# Altium PCB poyu.pcbdoc (part 2 of 2)
Units mm, origin at the board's own origin, x right, y up, seen from the top; angles counter-clockwise.
Board outline 44.28 x 42.46 mm, 4 copper layers (Top Layer, GND, VCC, Bottom Layer), stack 1.564 mm thick; 93 components, 51 nets, 337 pads, 150 vias.
Unrouted connection lines stored in the file: 71.
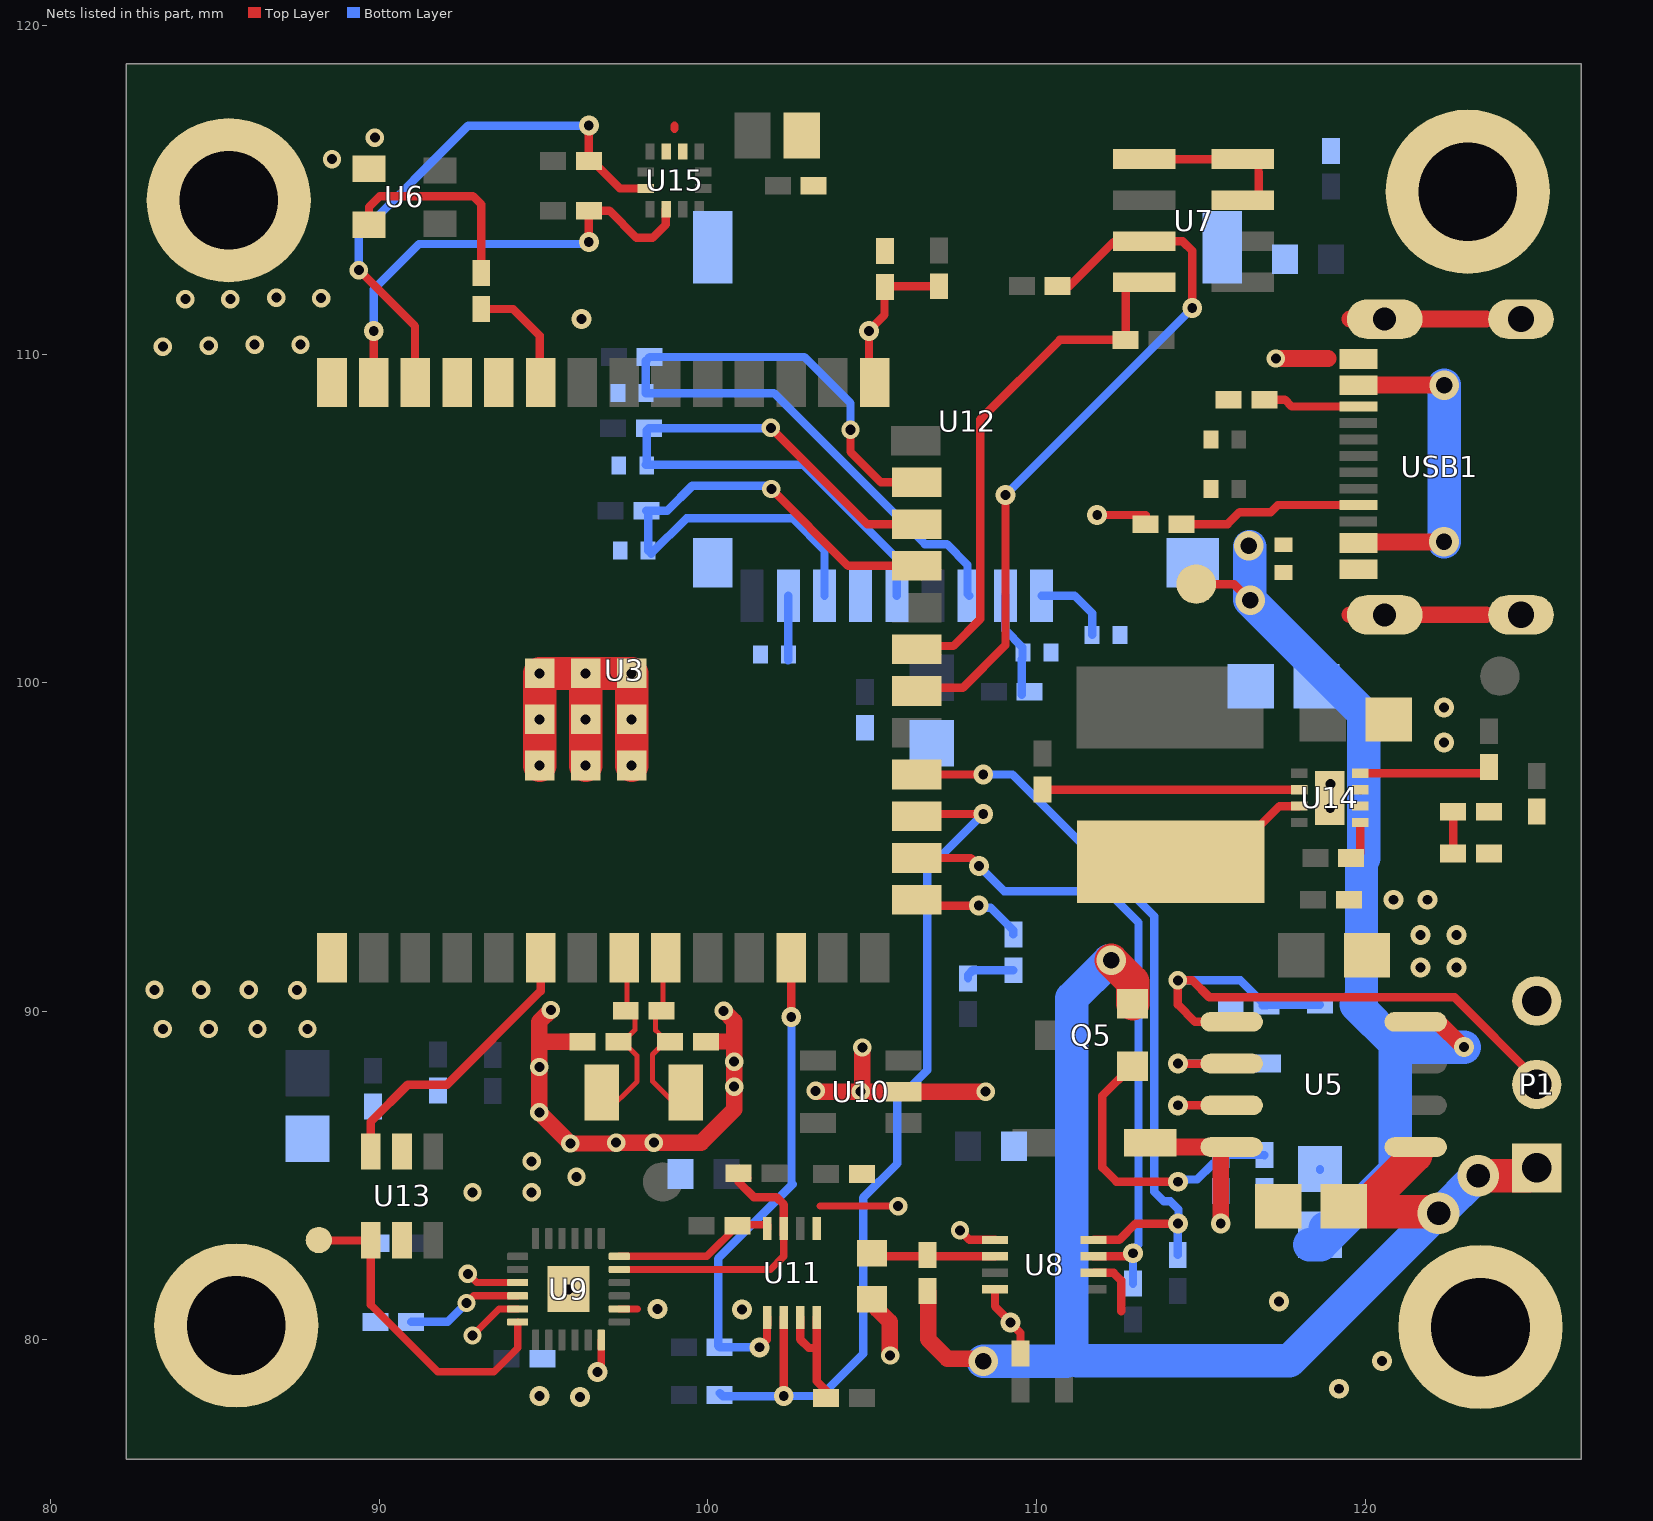
[diagram p4: the nets of this part, all layers, seen from the top]

## Via types
v1: diameter 0.559, hole 0.305, Top Layer to Bottom Layer, tented both sides, 79 vias
v2: diameter 0.605, hole 0.3, Top Layer to Bottom Layer, tented both sides, 57 vias
v3: diameter 0.9, hole 0.5, Top Layer to Bottom Layer, tented both sides, 6 vias
v4: diameter 0.605, hole 0.305, Top Layer to Bottom Layer, tented both sides, 5 vias
v5: diameter 1.27, hole 0.711, Top Layer to Bottom Layer, tented both sides, 3 vias

## Nets (pads, with @x,y where several pads share a name; then routed paths per layer and width w, separated by ;. In a path a pad name is that pad's centre, name@x,y a point inside that pad or via, vN(x,y) a via of type N, cw(c..) or ccw(c..) an arc to the next point about the centre after c; other vN are vias at no path point) (continued)
GND: C1.1 C2.1 C5.2 C6.2 C7.2 C12.1 C13.1 C14.1 C15.1 C16.1 C17.1 C18.1 C20.1 C21.1 C22.1 C23.1 C24.1 C26.2 C27.2 C28.2 C31.1 C32.1 C33.2 C41.1 C42.1 C44.2 D6.1 D7.1 D8.1 D9.1 D10.1 D11.1 D12.1 D13.1 D16.2 P1.3 pad.0 pad.1 pad.2 pad.3 R1.2 R3.1 R24.2 R27.2 R28.1 R55.2 U3.1 U3.40 U3.41 U5.3 U6.4 U7.3 U7.4 U7.5 U8.1 U8.4 U8.6 U9.9 U9.11 U9.18 U9.20 U9.25 U10.2 U11.1 U12.6 U12.10 U12.11 U12.12 U12.13 U13.2 U13.5 U14.2 U14.3 U14.9 U15.8 U15.9 USB1.0 USB1.A1B12 USB1.B1A12 | length 65.6
  Top Layer w0.219: v4@96.757,79.27 U9.18@96.757,80 ; U9.20@97.303,80.946 97.852,80.946 ; 103.418,84.074 v1(105.791,84.074)
  Top Layer w0.22: v1(92.697,82.014) 92.964,81.746 U9.9@94.213,81.746 ; v1(92.837,80.137) 93.646,80.946 U9.11@94.213,80.946
  Top Layer w0.254: 98.986,116.857 98.986,116.952 ; v1(107.671,83.337) 107.962,83.046 U8.1@108.736,83.046 ; U8.4@108.736,81.546 108.736,81.022 109.211,80.547 v2(109.211,80.53) 109.211,80.517 109.514,80.214 C18.1@109.514,79.59 ; U8.6@111.736,82.046 111.738,82.044 112.346,82.044 112.573,81.817 112.573,80.871 ; v2(111.846,105.105) 113.319,105.105 ; U7.5@113.757,115.934 U7.4@116.755,115.934 ; v2(114.3,87.141) U5.3@115.937,87.141 ; 116.755,115.533 U7.4@116.755,115.934 ; U7.3@116.757,114.684 116.757,115.533 ; U7.4@116.757,115.934 U7.4@116.755,115.934 ; U14.9@118.923,96.495 U14.9@118.939,96.478 ; v2(118.94,96.921) 118.939,96.92 U14.9@118.939,96.478 ; U14.9@118.995,96.245 v2(118.939,96.189) U14.9@118.939,96.478 ; U14.3@119.85,96.745 U14.3@119.863,96.732
  Top Layer w0.5: U3.1@88.392,91.463 U3.1@88.561,91.632 ; v1(95.222,90.041) 94.869,89.687 94.869,89.103 ; C21.1@96.186,89.078 94.894,89.078 94.869,89.103 ; C20.1@99.935,89.078 99.939,89.082 100.801,89.082 ; v1(100.481,90.016) 100.801,89.695 100.801,89.082 ; v1@103.276,87.556 v1(104.648,87.556) U10.2@105.948,87.556 v1(108.451,87.556) ; v1@104.699,87.623 v1(104.699,88.9) ; C17.1@105.156,81.166 105.156,80.937 105.537,80.556 105.537,79.54 v1(105.548,79.529) ; 94.869,89.103 v1(94.869,88.306) v1(94.869,86.925) v1(95.815,85.979) 97.164,85.979 97.19,86.004 99.792,86.004 100.801,87.014 v1(100.801,87.706) v1(100.801,88.468) 100.801,89.082
  Top Layer w0.508: v1(117.283,109.865) 118.878,109.865 ; USB1.0@119.533,102.069 123.683,102.069 ; USB1.0@119.533,111.069 123.683,111.069
  Top Layer w1.016: v1(94.881,97.482) v1(94.881,98.882) v1(94.881,100.282) v1(96.282,100.282) ; v1(96.282,97.482) v1(96.282,98.882) v1(96.282,100.282) ; v1(97.682,97.482) v1(97.682,98.882) v1(97.682,100.282) v1(96.282,100.282)
  Bottom Layer w0.254: C15.1@118.624,85.171 C15.1@118.624,85.201
  other v1: 95.758,81.537 92.837,84.491 94.636,84.491 96.001,84.963 94.636,85.435 97.206,86.004 98.355,86.004 103.276,87.579 83.415,89.462 84.811,89.462 86.294,89.462 87.817,89.462 83.16,90.653 84.582,90.653 86.03,90.653 87.503,90.647 83.415,110.227 84.811,110.257 86.208,110.287 87.605,110.287 84.099,111.671 85.471,111.671 86.868,111.718 88.234,111.703 88.561,115.934 89.865,116.586
  other v2: 119.209,78.517 120.507,79.363 101.036,80.923 117.382,81.175 121.689,91.332 122.779,91.332 121.689,92.322 122.779,92.318 120.866,93.397 121.899,93.397 122.398,98.179 122.398,99.251 96.153,111.069
  other v4: 96.107,78.265 94.881,78.294 96.635,79.028 98.47,80.943
GPIO0: C13.2 R20.2 U3.27 | length 4.7
  Top Layer w0.254: U3.27@104.846,109.232 104.902,109.288 v2(104.902,110.7) 104.902,110.721 105.375,111.194 105.375,112.029 105.408,112.063 R20.2@107.043,112.063
GPIO42: R4.1 U3.35 | length 3.6
  Top Layer w0.254: R4.1@93.105,111.374 94.075,111.374 94.882,110.568 94.882,109.162 U3.35@94.911,109.132
IMU_INT1: U3.6 U13.3 | length 8.7
  Top Layer w0.254: U13.3@89.745,85.737 89.745,86.646 90.866,87.767 92.064,87.767 94.911,90.615 U3.6@94.911,91.632
INT1: INT1.TP U9.12 U13.4 | length 9.9
  Top Layer w0.22: 89.745,81.075 91.783,79.037 93.494,79.037 94.213,79.756 U9.12@94.213,80.546
  Top Layer w0.254: INT1.TP@88.161,83.029 89.737,83.029 U13.4@89.745,83.037 89.745,81.075
NETC14_2: C14.2 P1.1 Q5.2 R31.1 U5.5 | length 42.1
  Top Layer w0.254: C14.2@119.353,84.074 C14.2@119.411,84.016 ; P1.1@124.978,84.994 P1.1@125.22,85.236
  Top Layer w0.5: R31.1@106.68,81.497 106.7,81.477 106.7,80.021 107.289,79.433 108.298,79.433 v3(108.374,79.356)
  Top Layer w1.016: v3(112.268,91.554) 112.922,90.9 Q5.2@112.922,90.229 ; C14.2@119.411,84.016 119.985,84.016 120.094,83.907 122.185,83.907 v5(122.234,83.858) ; C14.2@119.985,84.074 U5.5@121.537,85.626 ; v5(123.438,84.994) P1.1@124.978,84.994
  Bottom Layer w0.254: v3(108.374,79.356) v3@108.382,79.364 ; v5(122.234,83.858) v5@122.268,83.858 ; v5@123.404,84.994 v5(123.438,84.994)
  Bottom Layer w1.016: v3(108.374,79.356) 110.898,79.356 111.074,79.532 ; v3@112.217,91.542 111.074,90.399 111.074,79.532 ; v5(122.234,83.858) 122.183,83.858 117.689,79.364 111.242,79.364 111.074,79.532 ; v5@122.268,83.858 v5@123.404,84.994
NETC17_2: C17.2 R31.2 U8.2 | length 3.5
  Top Layer w0.254: C17.2@105.197,82.546 U8.2@108.736,82.546
NetC23_2: C23.2 U9.10 | length 3.6
  Top Layer w0.22: v1(92.655,81.125) 92.875,81.346 U9.10@94.213,81.346
  Bottom Layer w0.254: C23.2@90.969,80.546 90.98,80.557 92.086,80.557 v1(92.655,81.125)
NetC43_2: C43.2 R51.2 R52.2 U14.4 | length 4
  Top Layer w0.254: U14.4@119.85,97.245 123.625,97.245 123.768,97.388 R51.2@123.768,97.434
NetD6_2: D6.2 U12.8 | length 2
  Bottom Layer w0.254: D6.2@102.438,100.679 102.449,100.69 U12.8@102.449,102.65
NetD7_2: D7.2 U12.1 | length 2.4
  Bottom Layer w0.254: U12.1@110.149,102.65 111.158,102.65 111.691,102.117 D7.2@111.691,101.455
NetD8_2: D8.2 R46.2 U12.2 | length 3.2
  Bottom Layer w0.254: U12.2@109.049,102.65 109.049,101.604 109.574,101.079 109.574,100.736 109.555,100.717 R46.2@109.555,99.636
NetL1_1: L1.1 U14.7 | length 4.6
  Top Layer w0.254: L1.1@114.084,94.551 115.701,94.551 117.395,96.245 U14.7@117.995,96.245
NETP1_2: P1.2 R25.1 R28.2 U5.1 | length 20.3
  Top Layer w0.254: v1@114.358,90.887 v1(114.3,90.945) ; U5.1@115.287,89.681 U5.1@115.937,89.681 114.821,89.681 114.3,90.202 v1(114.3,90.945) ; P1.2@125.22,87.776 125.22,87.933 122.722,90.43 115.255,90.43 114.74,90.945 v1(114.3,90.945)
  Bottom Layer w0.254: v1(114.3,90.945) 116.205,90.945 116.877,90.274 116.877,90.18 R28.2@117,90.18 ; R28.2@117.013,90.192 118.611,90.192 R25.1@118.624,90.205
NETQ5_1: Q5.1 R21.2 R24.1 | length 9
  Top Layer w0.254: Q5.1@112.922,88.329 112.897,88.329 112.003,87.435 112.003,85.244 112.431,84.817 v2(114.3,84.817)
  Bottom Layer w0.254: v2(114.3,84.817) 114.367,84.884 114.886,84.884 115.365,85.363 115.46,85.363 115.603,85.506 R21.2@115.603,85.631 116.93,85.631 R24.1@116.937,85.624
NETR1_1: R1.1 USB1.A5 | length 6
  Top Layer w0.254: R1.1@114.409,104.825 115.815,104.825 116.182,105.192 117.129,105.192 117.344,105.407 USB1.A5@120.129,105.407
NETR3_2: R3.2 USB1.B5 | length 2.9
  Top Layer w0.254: R3.2@116.931,108.614 117.555,108.614 117.761,108.407 USB1.B5@119.793,108.407
NETR10_1: R10.1 R11.1 | length 1.5
  Bottom Layer w0.254: R10.1@107.916,91.005 107.916,91.108 108.059,91.251 R11.1@109.296,91.251
NETR11_2: R11.2 U3.15 | length 5.6
  Top Layer w0.2: U3.15@106.351,93.397 106.631,93.118 U3.15@106.468,93.281
  Top Layer w0.254: U3.15@106.406,93.218 v2(108.241,93.218) U3.15@106.631,93.218
  Bottom Layer w0.254: v2(108.241,93.218) 108.308,93.151 108.611,93.151 109.296,92.466 R11.2@109.296,92.341
NETR27_1: R27.1 U5.2 | length 3.3
  Top Layer w0.254: v2(114.3,88.411) U5.2@115.937,88.411
  Bottom Layer w0.254: v2(114.3,88.411) R27.1@115.96,88.411
NetR36_1: R36.1 U11.7 U11.8 | length 3.7
  Top Layer w0.254: U11.7@102.81,80.692 102.81,80.019 103.073,79.756 103.276,79.756 ; U11.8@103.31,80.692 103.31,78.75 R36.1@103.64,78.421
NetR52_1: R52.1 R55.1 | length 1.3
  Top Layer w0.254: R55.1@122.678,94.805 R52.1@122.678,96.075
NetR54_1: R54.1 U14.1 | length 1.3
  Top Layer w0.254: R54.1@119.573,94.667 119.698,94.667 119.85,94.82 U14.1@119.85,95.745
NetR56_2: R56.2 U14.6 | length 7.8
  Top Layer w0.254: R56.2@110.18,96.753 110.189,96.745 U14.6@117.995,96.745
RGB_CTL: R4.2 U6.3 | length 6.3
  Top Layer w0.254: U6.3@89.687,113.938 89.687,114.478 90.018,114.808 92.847,114.808 93.105,114.551 R4.2@93.105,112.419
SCL: R35.2 U3.17 U11.6 | length 27.3
  Top Layer w0.254: v2@102.31,78.294 U11.6@102.31,80.692 ; U3.17@106.351,95.937 106.422,96.008 v2(108.377,96.008)
  Bottom Layer w0.254: R35.2@100.36,78.386 100.458,78.288 102.303,78.288 v2(102.309,78.294) 103.44,78.294 104.724,79.578 104.724,84.328 105.766,85.369 105.766,87.298 106.674,88.206 106.674,94.304 v2(108.377,96.008)
SCL1: R6.1 U3.21 U7.8 | length 16.3
  Top Layer w0.254: U3.21@106.126,101.117 107.467,101.117 108.287,101.937 108.287,108.008 110.712,110.432 R6.1@112.714,110.432 112.714,112.011 112.887,112.184 U7.8@113.278,112.184 ; U7.8@113.724,112.152 U7.8@113.757,112.184
SCL2: R29.1 U3.16 U8.7 | length 19.7
  Top Layer w0.25: U8.7@111.736,82.546 U8.7@111.736,82.546
  Top Layer w0.254: U3.16@106.351,94.667 108.002,94.667 v2(108.246,94.423) v2@108.151,94.423 ; U8.7@111.736,82.546 111.74,82.546 v2@112.747,82.546
  Bottom Layer w0.254: v2(108.246,94.423) 109.011,93.658 112.149,93.658 113.103,92.704 113.103,82.902 112.937,82.736 v2(112.937,82.641) R29.1@112.937,81.713
SCL3: R5.2 U3.38 U15.12 | length 16.7
  Top Layer w0.254: v1(89.381,112.556) 91.088,110.849 91.088,109.146 U3.38@91.101,109.132 ; v2(96.377,116.952) 96.377,115.983 97.321,115.039 U15.12@98.111,115.039
  Bottom Layer w0.254: v1(89.381,112.556) 89.381,113.626 92.707,116.952 v2(96.377,116.952)
SCL_REF: R38.2 U9.23 U11.3 | length 8.8
  Top Layer w0.219: U9.23@97.303,82.146 101.907,82.146 102.31,82.549 U11.3@102.31,83.192
  Top Layer w0.254: R38.2@100.936,84.804 101.397,84.344 102.085,84.344 102.31,84.118 U11.3@102.31,83.392 U11.3@102.31,83.192 ; R38.2@100.936,85.074 100.981,85.074 101.061,85.074 R38.2@101.204,84.931 ; R38.2@101.064,85.004 R38.2@101.064,85.051
SDA: R34.2 U3.12 U11.5 | length 15.1
  Top Layer w0.254: v2(101.566,79.777) 101.799,80.01 U11.5@101.799,80.461 ; U11.5@101.81,80.472 U11.5@101.81,80.692 ; U3.12@102.531,91.632 102.535,91.628 v2(102.535,89.832)
  Bottom Layer w0.254: v2(101.566,79.777) R34.2@100.36,79.777 100.314,79.823 100.314,82.473 102.582,84.741 ; v2@102.489,89.785 v2(102.535,89.832) 102.546,89.821 102.546,84.741
SDA1: R7.1 U3.20 U7.7 | length 22.8
  Top Layer w0.254: U3.20@106.126,99.847 107.758,99.847 109.055,101.144 v2(109.055,105.714) ; R7.1@110.642,112.069 111,112.069 112.344,113.412 U7.7@112.858,113.412 ; U7.7@112.628,113.434 U7.7@113.278,113.434 114.447,113.434 114.74,113.141 v2(114.74,111.399)
  Bottom Layer w0.254: v2(109.055,105.714) v2(114.74,111.399)
SDA2: R26.1 U3.18 U8.8 | length 22.7
  Top Layer w0.254: U3.18@106.502,97.057 U3.18@106.351,97.207 v2(108.377,97.207) ; U8.8@111.736,83.046 112.517,83.046 113.012,83.541 v2(114.3,83.541)
  Bottom Layer w0.254: v2(108.377,97.207) 109.268,97.207 113.584,92.892 113.584,84.509 113.873,84.22 114.075,84.22 114.32,83.974 114.32,83.561 v2(114.3,83.541) R26.1@114.3,82.587
SDA3: R2.2 U3.39 U15.2 | length 14.3
  Top Layer w0.254: U3.39@89.831,109.132 v2(89.831,110.7) ; v2(96.377,113.412) R2.2@96.377,114.363 97,114.363 97.826,113.538 98.316,113.538 98.723,113.945 98.723,114.401 U15.2@98.736,114.414
  Bottom Layer w0.254: v2(89.831,110.7) 89.831,111.97 91.211,113.35 96.314,113.35 v2(96.377,113.412)
SDA_REF: R37.2 U9.24 U11.4 | length 5.1
  Top Layer w0.219: U9.24@97.303,82.546 99.968,82.546 R37.2@100.9,83.478
  Top Layer w0.22: R37.2@100.855,83.51 U11.4@101.807,83.51
  Top Layer w0.254: U11.4@101.807,83.51 101.81,83.507 U11.4@101.81,83.392
TF_CMD: D9.2 R45.2 U3.25 U12.3 | length 24.6
  Top Layer w0.254: v1(104.34,107.698) 104.34,107.027 105.269,106.097 U3.25@106.351,106.097
  Bottom Layer w0.254: v1(104.34,107.698) 104.34,108.506 102.936,109.91 R45.2@98.228,109.91 98.113,109.795 D9.2@98.113,108.814 102.006,108.814 106.604,104.216 107.272,104.216 107.899,103.589 107.899,102.7 U12.3@107.949,102.65
TF_DATA0: D11.2 R43.2 U3.23 U12.7 | length 18.3
  Top Layer w0.254: v1(101.929,105.894) 104.266,103.557 U3.23@106.351,103.557
  Bottom Layer w0.254: D11.2@98.181,104.019 98.181,105.183 R43.2@98.129,105.236 98.765,105.236 99.523,105.994 101.829,105.994 v1(101.929,105.894) ; D11.2@98.273,103.927 99.35,105.004 102.555,105.004 ; 102.584,104.995 103.549,104.029 U12.7@103.549,102.65
TF_SCLK: D10.2 R44.2 U3.24 U12.5 | length 20.5
  Top Layer w0.254: v1(101.916,107.756) 104.845,104.827 U3.24@106.351,104.827
  Bottom Layer w0.254: v1@101.916,107.747 R44.2@98.205,107.747 98.139,107.681 98.139,106.655 98.113,106.629 102.904,106.629 105.749,103.784 U12.5@105.749,102.65 U12.5@105.755,102.656
U0RXD: U3.36 | length 0.1
  Top Layer w0.254: U3.36@93.57,109.204 U3.36@93.641,109.132
U0TXD: U3.37
VBS: C15.2 C33.1 D1.2 D16.1 R21.1 R25.2 U5.4 U5.8 USB1.A4B9 USB1.B4A9 VBS.TP | length 45.9
  Top Layer w0.254: D1.2@113.463,86.002 D1.2@113.594,85.871 ; VBS.TP@114.859,103 114.863,102.996 116.015,102.996 v3(116.505,102.505) v3@116.331,102.505 ; U5.4@115.606,85.714 U5.4@115.763,85.871 ; USB1.B4A9@119.793,108.903 119.793,109.04 USB1.B4A9@119.793,109.203 ; U5.8@121.537,89.681 U5.8@122.215,89.681 ; v2@122.985,88.911 v2(123.012,88.911)
  Top Layer w0.508: D1.2@113.594,85.871 U5.4@115.763,85.871 ; v2(115.606,83.545) U5.4@115.606,85.714 ; USB1.A4B9@119.578,104.283 v3(122.398,104.283) ; USB1.B4A9@119.793,109.04 USB1.B4A9@119.798,109.035 ; USB1.B4A9@119.793,109.058 v3(122.409,109.058) ; U5.8@122.215,89.681 v2@122.985,88.911
  Bottom Layer w0.254: v3(116.46,104.164) v3@116.482,104.141 ; v3@116.482,102.528 v3(116.505,102.505) ; 120.913,89.015 121.018,88.911
  Bottom Layer w1.016: v3@116.482,102.528 v3@116.482,104.141 ; v3(116.505,102.505) 119.955,99.056 119.955,94.664 119.888,94.597 R25.2@119.888,90.205 ; C15.2@118.307,82.902 118.65,82.902 120.913,85.165 120.913,89.015 R25.2@119.724,90.205 ; C15.2@118.791,83.203 C15.2@118.791,83.398 ; 121.018,88.911 v2(123.012,88.911) ; v3(122.398,104.283) 122.409,104.294 v3(122.409,109.058)
XTAL_32K_N: C20.2 R40.1 U3.9 X1.2 | length 5.1
  Top Layer w0.152: R40.1@98.412,90.009 98.412,89.421 98.73,89.103 98.312,88.685 98.312,87.872 X1.2@99.274,86.91 ; R40.1@98.64,90.284 U3.9@98.64,91.551
XTAL_32K_P: C21.2 R40.2 U3.8 X1.1 | length 5.1
  Top Layer w0.152: X1.1@96.849,86.868 97.841,87.86 97.841,88.654 97.419,89.076 97.777,89.434 R40.2@97.777,90.009 ; 97.531,90.293 U3.8@97.531,91.515
pads on no net: U3.4 U3.7 U3.10 U3.11 U3.19 U3.26 U3.28 U3.29 U3.30 U3.31 U3.32 U3.33 U3.34 U5.6 U5.7 U6.2 U7.6 U9.1 U9.2 U9.3 U9.4 U9.5 U9.6 U9.7 U9.14 U9.15 U9.16 U9.17 U9.19 U9.21 U10.4 U12.9 U15.1 U15.4 U15.6 U15.10 U15.11 USB1.A8 USB1.B8

## Polygon pours and split planes (outlines as drawn)
GND on Top Layer "GND_L01_P144" (solid, remove dead copper, pour order 144): 81.102,119.355 126.576,119.355 126.795,75.87 81.102,75.87
NetC43_2 on Top Layer "NETC43_2_L01_P159" (solid, remove dead copper, pour order 159): 123.269,97.606 125.718,97.636 125.718,95.449 123.304,95.453 123.304,96.643
3.3V on Top Layer "3.3V_L01_P161" (solid, remove dead copper, pour order 161): 100.807,117.356 101.907,117.356 101.907,115.956 102.474,115.389 102.524,115.389 102.524,114.849 102.128,114.454 102.119,114.036 101.816,113.733 101.224,113.733 101.193,115.389 100.808,115.956
3.3V on Top Layer "3.3V_L01_P160" (solid, remove dead copper, pour order 160): 94.587,116.45 95.674,116.45 95.682,113.782 94.593,113.782 93.43,113.782 93.43,116.449
NETC14_2 on Top Layer "NETC14_2_L01_P158" (solid, remove dead copper, pour order 158): 118.648,83.399 118.624,83.201 126.068,83.201 126.068,85.887 125.9,86.055 123.514,86.055 122.159,84.701 118.624,84.701
VBS on Top Layer "VBS_L01_P157" (solid, remove dead copper, pour order 157): 119.312,104.557 115.535,104.557 115.535,103.676 115.563,102.505 116.719,102.576 116.88,102.737 116.875,103.957 119.312,103.957
3.3V on Top Layer "3.3V_L01_P155" (solid, pour order 155): 118.223,97.12 117.689,97.12 117.569,97.24 117.569,97.888 117.429,98.027 111.071,98.027 111.071,100.547 111.334,100.809 117.071,100.809 117.071,99.614 118.038,99.551 118.038,100.966 120.451,100.966 125.718,100.966 125.718,97.025 125.415,96.722 124.765,96.722 124.765,97.653 124.302,98.116 123.351,98.116 123.351,99.884 123.238,99.997 119.418,100.016 119.418,98.551 119.418,98.171 118.203,98.181
GND on Top Layer "GND_L01_P152" (solid, pour order 152): 120.232,96.896 120.232,96.037 119.373,96.037 119.373,95.67 118.477,95.667 118.471,97.321 118.477,98.14 119.794,98.14 119.794,99.747 121.867,99.747 123.043,99.747 123.043,97.679 119.406,97.679 119.406,97.245 119.406,96.896
GND on Top Layer "GND_L01_P150" (solid, pour order 150): 119.028,94.158 120.142,94.158 120.734,94.158 120.734,93.904 123.51,93.904 123.51,90.74 119.028,90.74 119.028,91.988
3.3V on Top Layer "3.3V_L01_P147" (solid, remove dead copper, pour order 147): 104.349,116.22 104.349,114.262 106.216,114.262 106.264,114.262 106.614,113.761 106.53,112.835 108.265,112.835 108.671,112.429 108.671,110.879 109.927,110.879 109.952,110.903 109.915,116.22
3.3V on Top Layer "Top Layer-3.3V 2" (solid, pour order 112): 109.118,83.947 106.591,83.947 106.139,84.4 106.139,85.104 105.37,85.873 105.37,86.919 108.928,86.919 109.083,86.764
no net on Top Layer "Top Layer-No Net 8" (solid, pour order 110): 106.421,83.909 106.054,83.965 106.054,84.052 106.076,84.074 106.076,84.18 106.128,84.201 106.261,84.201 106.261,84.074 106.306,84.029 106.306,83.961
3.3V on Top Layer "Top Layer-3.3V 3" (solid, pour order 104): 99.695,80.14 99.695,77.47 97.158,77.47 97.158,77.978 97.158,78.362 98.933,80.137
1.8V on Top Layer "Top Layer-1.8V" (solid, pour order 102): 97.536,84.582 99.48,84.582 99.949,85.051 99.949,85.488 100.355,85.877 101.956,85.877 104.013,85.877 104.013,85.852 104.013,85.648 104.013,85.51 104.013,84.648 102.675,84.648 102.489,84.834 102.489,85.086 102.065,85.51 101.219,85.51 101.036,85.319 101.036,84.234 99.982,84.234 99.822,84.074 99.822,83.177 97.544,83.177
3.3V on Top Layer "Top Layer-3.3V 6" (solid, pour order 32): 104.394,78.83 111.436,78.83 111.436,77.472 104.394,77.472
5V on Top Layer "Top Layer-5V 1" (solid, pour order 30): 109.982,92.253 111.252,92.253 111.252,85.178 111.252,83.648 109.22,83.648 109.22,85.68 109.982,86.823
GND on Bottom Layer "GND_L04_P143" (solid, pour order 143): 82.169,119.355 126.723,119.355 126.795,75.87 82.041,75.87
3.3V on Bottom Layer "3.3V_L04_P149" (solid, pour order 149): 117.255,115.586 119.702,115.589 119.702,112.227 118.562,112.185 118.572,113.232 118.317,113.467 117.255,113.467
3.3V on Bottom Layer "3.3V_L04_P148" (solid, pour order 148): 99.663,80.439 99.695,80.407 99.663,78.057 97.355,78.057 97.355,78.265 97.355,80.46
3.3V on Bottom Layer "3.3V_L04_P142" (solid, pour order 142): 112.573,80.943 113.584,80.943 113.584,81.833 113.634,81.882 116.345,81.882 116.505,81.722 116.505,80.137 112.573,80.137 112.573,80.438
VBS on Bottom Layer "VBS_L04_P137" (solid, pour order 137): 119.353,84.074 117.368,84.074 117.173,83.879 116.39,83.879 116.39,85.085 116.37,85.104 114.884,85.104 114.884,82.043 119.353,82.043
3.3V on VCC (split plane): 126.066,76.888 82.806,76.888 82.806,118.332 126.066,118.332
1.8V on VCC (split plane): 104.011,86.36 104.011,81.969 104.011,80.711 103.909,80.609 100.647,80.609 100.598,80.6 100.556,80.571 99.946,79.962 95.809,79.962 95.759,79.952 95.717,79.924 95.26,79.467 95.232,79.425 95.222,79.375 95.222,78.184 94.638,77.599 88.267,77.599 88.267,81.28 88.267,81.788 88.258,81.838 88.23,81.88 86.235,83.874 86.235,86.052 86.505,86.322 92.684,86.322 94.134,84.871 94.176,84.843 94.226,84.834 98.933,84.834 98.983,84.843 99.025,84.871 101.019,86.866 104.011,86.866
5V on VCC (split plane): 112.418,107.227 110.858,105.667 110.83,105.625 110.82,105.575 110.82,94.334 110.83,94.284 110.858,94.242 111.287,93.812 111.329,93.784 111.379,93.774 118.309,93.774 118.443,93.64 118.443,90.94 118.031,90.528 107.214,90.528 106.073,91.669 106.073,111.581 112.418,111.581
GND on GND (split plane): 126.066,76.888 82.806,76.888 82.806,118.332 126.066,118.332

## Keep-outs
Top Layer:
  region: 82.169,109.482 86.995,109.482 86.995,91.313 82.169,91.313
Bottom Layer:
  region: 82.169,109.29 87.353,109.29 87.353,91.482 82.169,91.482
Board Outline Layer:
  lines w0.254: 82.292,118.842 126.589,118.842 ; 82.296,118.105 ccw(c82.296,117.978) 82.169,117.965 ccw(c82.296,117.953) 82.169,117.953 82.169,76.378 126.576,76.378

## Other copper
Top Layer:
  pour cut-out: 111.436,77.447 111.759,77.77 111.759,79.049 112.105,78.703 112.105,77.841 112.503,77.443
  pour cut-out: 121.978,96.804 122.874,96.804 122.874,96.788 122.886,96.777 122.819,96.646 121.978,96.646
  pour cut-out: 92.651,116.294 92.651,115.248 92.68,115.219 93.052,115.219 93.119,115.287 93.117,115.29 93.117,116.298
  pour cut-out: 126.029,97.025 126.029,96.434 125.823,96.64 125.823,96.772
  pour cut-out: 121.978,96.65 121.977,96.649 121.765,96.649 121.765,96.564 121.818,96.511 121.911,96.511
  pour cut-out: 111.334,101.12 111.324,101.11 110.65,101.11 110.65,100.777 109.624,99.751 109.793,99.581 109.793,97.525 110.746,97.525 110.815,97.594 110.815,100.618
  pour cut-out: 96.84,83.722 97.236,83.722 97.251,83.708 97.231,83.688 97.231,83.626 97.147,83.581 97.108,83.581
  pour cut-out: 94.337,82.967 93.208,82.967 93.204,82.964 93.45,82.718 93.47,82.718
  pour cut-out: 93.582,80.628 93.582,79.712 93.8,79.93 93.79,79.939 93.79,80.151
  pour cut-out: 122.225,88.9 122.409,88.716 124.856,88.716 126.275,87.637 126.275,86.121 123.139,86.121 122.908,85.889 122.634,85.889 122.634,85.976 122.234,86.376
  pour cut-out: 113.709,104.25 113.72,104.239 115.999,104.239 115.999,102.299 115.795,102.095 113.735,102.095 113.709,102.069
  pour cut-out: 112.023,115.289 110.229,115.289 110.147,115.206 110.147,114.074 111.524,114.074 112.021,113.577
  pour cut-out: 115.023,114.039 114.533,114.039 114.533,113.82 114.804,113.549 114.865,113.611 115.03,113.611
  pour cut-out: 108.814,105.029 108.817,105.025 109.552,105.025 109.577,105.051 109.577,106.181 110.634,107.238 110.634,109.857 108.728,107.951 108.728,105.356
  pour cut-out: 97.237,84.55 97.237,85.643 97.232,85.648 97.232,85.649 98.059,85.649 98.216,85.492 97.788,85.065 97.788,84.819
  pour cut-out: 102.62,87 100.788,87 99.986,86.199 99.986,85.755 100.386,85.755 100.63,85.51 101.642,85.51 101.642,86.296 101.631,86.307 101.648,86.324 102.623,86.324
  pour cut-out: 111.633,85.471 114.866,85.471 115.203,85.134 115.203,83.142 111.505,83.142 111.436,83.21 111.444,83.218 111.444,85.481
  pour cut-out: 111.33,89.731 111.38,89.681 114.987,89.681 114.987,89.321 115.225,89.083 115.1,88.958 115.1,87.95 111.897,87.95 111.641,87.694 111.338,87.694
  pour cut-out: 109.704,88.603 109.711,88.61 109.711,91.375 109.376,91.375 107.832,89.832 105.083,89.832 105.083,89.121 105.294,88.91 108.966,88.91 109.274,88.602
  region net 1.8V: 101.759,85.825 101.928,85.994 102.348,85.574 102.74,85.574 102.798,85.632 102.798,86.906 103.898,86.906 103.99,86.814 103.99,84.781 101.759,84.781
  region net NetL1_1: 118.248,96.385 117.347,96.385 115.513,94.551 114.084,94.551 114.084,93.301 116.934,93.301 117.45,93.817 117.45,95.902 117.653,96.105 118.248,96.105
  region net 5V: 118.237,95.885 118.237,95.579 118.878,94.937 118.878,91.15 118.758,91.031 115.939,91.031 115.563,91.407 115.563,92.616 115.922,92.975 117.288,92.975 117.743,93.43 117.743,95.885
  pour cut-out: 113.738,90.932 113.813,90.932 114.214,91.334 114.214,91.377 113.699,91.377 113.632,91.31
  pour cut-out: 113.702,89.474 113.705,89.477 114.411,89.477 114.411,89.651 113.918,90.144 113.918,90.81 113.868,90.859 113.867,90.858 113.742,90.858 113.742,90.252 113.584,90.094 113.702,89.976
  pour cut-out: 105.963,112.743 105.963,112.503 106.673,112.503 106.779,112.609 106.498,112.89 106.236,112.89
  pour cut-out: 107.239,100.025 108.428,100.025 108.623,100.221 109.018,100.221 109.018,97.6 109.1,97.519 109.08,97.499 107.254,97.499
  pour cut-out: 110.634,107.238 109.559,106.163 109.299,106.163 109.299,106.86 110.619,108.18 110.626,108.18
  pour cut-out: 113.828,104.113 115.857,104.113 116.37,104.626 116.37,104.68 113.951,104.68 113.806,104.535
  pour cut-out: 118.038,101.276 117.228,101.276 117.071,101.12 117.382,100.809 117.382,99.906 117.399,99.889 117.641,99.889 117.727,99.976 117.727,100.966
  pour cut-out: 110.694,95.781 111.071,95.781 110.929,95.639 110.929,92.565 110.799,92.435 109.649,92.435 109.649,95.086 109.685,95.121 110.696,95.121
  pour cut-out: 110.761,98.027 117.429,98.027 117.429,95.881 117.472,95.839 117.414,95.781 110.694,95.781
  pour cut-out: 106.105,80.797 106.105,79.144 106.108,79.141 106.829,79.141 106.87,79.182 106.794,79.259 106.663,79.259 106.663,79.319 106.134,79.848 106.134,80.797
  pour cut-out: 105.512,79.146 105.506,79.141 103.75,79.141 103.75,78.933 103.876,78.807 104.083,78.807
  pour cut-out: 117.924,89.63 117.67,89.376 117.276,89.376 117.276,88.645 117.26,88.661 116.88,88.661 116.88,89.051 116.821,89.111 117.121,89.411 117.121,89.681
  pour cut-out: 117.472,89.681 119.882,89.681 119.887,89.687 120.237,89.337 120.237,88.654 120.327,88.654 120.666,88.993 120.666,89.315 120.257,89.724
  pour cut-out: 118.394,84.876 118.394,85.951 118.488,86.055 119.985,86.055 119.985,85.222 119.74,84.978 119.527,84.978
  pour cut-out: 119.99,86.893 119.985,86.888 119.985,85.222 120.277,85.222 120.591,85.537 120.451,85.677 120.451,86.307 120.603,86.307 120.866,86.571 120.518,86.919 119.98,86.919
  pour cut-out: 90.309,112.6 92.381,112.6 94.882,110.1 94.868,110.086 91.101,110.086 91.101,111.462 90.748,111.815
  pour cut-out: 100.717,90.342 100.709,90.349 99.34,90.349 99.34,90.354 99.115,90.579 100.717,90.579
  pour cut-out: 103.745,81.347 102.692,81.347 102.645,81.394 102.645,81.649 103.232,82.236
  pour cut-out: 87.177,108.379 105.308,108.379 105.308,92.718 105.193,92.603 87.112,92.603
  pour cut-out: 104.05,86.153 103.996,86.153 103.978,86.026 104.002,86.002 104.05,86.002
  pour cut-out: 111.33,92.353 111.33,89.731 111.396,89.664 112.295,89.664 112.295,90.903 112.078,91.119 111.834,91.119 111.834,91.374 111.654,91.554 111.834,91.734 111.834,91.988 112.003,91.988 112.192,92.177
  pour cut-out: 121.338,105.105 119.461,105.105 119.461,104.714 119.476,104.698 120.461,104.698 120.614,104.851 121.12,104.851 121.357,104.614
  pour cut-out: 101.545,87.404 101.545,87.078 101.385,86.919 101.117,86.919 101.117,87.006 101.194,87.082 101.155,87.12 101.155,87.401
  pour cut-out: 102.39,87.404 102.394,87.399 102.685,87.399 102.685,87.065 102.62,87 102.387,87
  pour cut-out: 107.725,83.818 107.725,83.632 107.721,83.629 107.731,83.62 109.083,83.62 109.083,83.754 109.055,83.782
  pour cut-out: 104.178,84.648 102.586,84.648 102.435,84.496 102.435,83.744 103.111,83.744 103.215,83.847 103.215,84.22 103.336,84.341 104.179,84.341
  pour cut-out: 94.526,82.778 96.976,82.778 96.976,80.328 94.558,80.328
  pour cut-out: 95.127,90.373 94.513,89.759 94.513,86.766 95.631,85.648 99.986,85.649 99.986,85.755 101.219,86.988 101.194,87.013 101.194,89.865 100.717,90.342
  pour cut-out: 109.152,83.552 111.32,83.552 111.417,83.648 111.436,83.629 111.436,83.21 109.541,83.21 109.143,82.813
  pour cut-out: 107.671,83.62 109.083,83.62 109.22,83.483 109.22,81.128 107.625,81.128 107.6,81.153
  pour cut-out: 99.605,80.305 99.673,80.305 99.799,80.178 100.029,80.178 100.025,80.182 100.025,80.302
  pour cut-out: 98.923,90.401 98.781,90.401 98.781,90.74 98.873,90.832 98.925,90.832
  pour cut-out: 109.135,81.573 109.191,81.552 109.191,81.509 109.207,81.493 109.207,81.43
  pour cut-out: 109.004,82.928 109.207,82.928 109.191,82.753 109.141,82.702
  pour cut-out: 107.102,80.08 107.544,80.08 107.59,80.033 107.59,79.984 107.137,79.984 107.134,79.982
  pour cut-out: 108.043,81.728 108.077,81.761 108.393,81.761 108.439,81.715 108.439,81.701 108.975,81.701 109.008,81.668 108.002,81.668
  pour cut-out: 108.942,81.832 109.255,81.832 109.274,81.813 109.191,81.731 109.191,81.668 109.008,81.668 109.004,81.664
  pour cut-out: 105.224,92.895 107.029,92.895 107.111,92.812 107.111,91.081 107.096,91.097 105.791,91.097 105.791,91.034 105.639,90.881 105.385,90.881 105.449,90.945 105.449,92.635 105.225,92.635 105.224,92.634
  pour cut-out: 97.379,83.246 97.379,83.109 97.476,83.012 99.623,83.012 99.674,82.961 99.674,82.878 99.6,82.804 97.379,82.804
  pour cut-out: 107.051,82.321 107.051,80.028 107.102,80.08 107.544,80.08 107.544,80.15 107.391,80.302 107.442,80.353 107.442,80.599 107.594,80.751 107.594,81.957 107.959,82.321
Bottom Layer:
  pour cut-out: 107.922,97.117 107.923,97.116 107.923,94.931 107.109,94.116 107.109,89.198 110.25,89.198 110.682,89.631 110.682,91.163 111.48,91.163 112.678,92.36 112.663,92.375 112.663,92.522 111.637,93.547 111.637,94.216 109.031,96.822 108.119,96.822
  pour cut-out: 97.044,78.265 97.044,77.596 97.047,77.593 97.067,77.612 105.199,77.612 105.199,79.529 105.169,79.559 103.507,77.897 97.228,77.897 97.178,77.947
  pour cut-out: 101.572,112.592 105.26,112.592 105.66,112.192 105.623,112.155 105.623,108.256 102.898,108.256 101.549,109.605
  pour cut-out: 105.639,112.213 105.66,112.192 108.352,112.192 108.834,111.71 108.834,109.51 107.571,108.247 107.562,108.256 105.623,108.256
  pour cut-out: 91.912,113.791 91.911,113.79 91.343,113.79 91.343,114.957 91.345,114.959 91.344,114.959 91.344,115.047 89.693,113.395 89.693,112.727 89.848,112.572 91.069,113.794 91.179,113.794
  pour cut-out: 121.348,96.125 120.74,96.125 120.775,96.16 120.775,96.685 120.822,96.732
  pour cut-out: 121.92,97.257 120.783,97.257 120.775,97.248 120.775,97.053 120.868,96.96 120.945,97.036 120.945,97.098
  pour cut-out: 124.165,85.814 121.725,85.814 121.512,85.601 121.512,84.513 121.581,84.444 121.762,84.625 121.91,84.625
  pour cut-out: 116.816,81.722 116.816,80.184 117.349,80.184 118.781,81.615 118.732,81.664 118.732,81.733
  pour cut-out: 121.733,85.165 121.733,85.095 119.491,82.853 119.491,82.291 119.495,82.291 121.773,84.568
  pour cut-out: 111.894,90.059 112.545,90.71 112.614,90.71 112.663,90.662 112.663,81.349 112.172,80.858 112.172,80.184 111.894,80.184
  pour cut-out: 109.871,93.041 109.39,93.041 109.351,93.091 109.414,93.218 109.865,93.218
  pour cut-out: 104.775,108.255 104.775,106.591 104.135,107.231 104.135,107.251 104.229,107.251 104.633,107.655 104.772,107.655
  pour cut-out: 110.804,101.545 110.804,102.21 110.975,102.21 111.179,102.006 111.179,101.545
  pour cut-out: 107.43,99.032 107.43,99.07 107.542,99.13 107.765,99.074 107.765,99.061
  pour cut-out: 110.255,99.061 109.151,99.061 109.104,98.935 109.118,98.921 109.157,98.882 110.255,98.882
  pour cut-out: 97.66,106.365 104.525,106.365 105.422,105.468 105.422,103.429 97.714,103.429 97.688,103.454
  pour cut-out: 97.66,109.22 97.672,109.208 103.108,109.208 103.108,106.914 103.068,106.954 97.67,106.954
  pour cut-out: 107.188,101.778 107.239,101.727 109.211,101.727 109.211,100.108 109.128,100.025 107.239,100.025
  pour cut-out: 98.081,103.988 98.081,103.602 98.181,103.602 98.629,104.05
  pour cut-out: 98.081,103.602 99.33,104.617 102.701,104.617 103.22,104.098 103.22,103.602
  pour cut-out: 103.682,106.608 103.971,106.319 107.07,106.319 107.614,105.775 107.614,103.692 107.525,103.602 106.039,103.602 106.039,103.846 105.432,104.454 104.686,104.454 103.197,105.943 103.197,106.181 103.564,106.548
  pour cut-out: 98.44,107.462 101.898,107.462 102.349,107.01 102.236,106.897 98.645,106.897 98.629,106.914 98.629,107.061 98.347,107.061 98.347,107.319
  pour cut-out: 104.283,107.391 104.188,107.486 103.803,107.486 103.803,107.706 101.812,109.697 98.618,109.697 98.525,109.605 98.525,109.287 98.663,109.149 101.855,109.149 103.893,107.112 103.988,107.112
VCC (plane layer: these items are gaps in the copper):
  lines w0.254: 86.106,85.852 86.106,86.106 ; 105.943,111.71 105.943,91.615 107.16,90.399 118.085,90.399 118.572,90.886 118.572,93.694 118.362,93.904 111.379,93.904 110.949,94.334 110.949,105.575 112.547,107.174 112.547,111.71 106,111.71 ; 86.106,86.106 86.452,86.452 92.737,86.452 94.226,84.963 98.933,84.963 100.965,86.995 103.505,86.995 104.07,86.995 104.14,86.925 104.14,86.36 104.14,81.969 104.14,80.657 103.963,80.48 100.647,80.48 100,79.832 95.809,79.832 95.352,79.375 95.352,78.13 94.691,77.47 88.138,77.47 88.138,81.28 88.138,81.788 86.106,83.82 86.106,86.106
Multi-Layer:
  pour cut-out: 82.296,109.382 87.101,109.382 87.101,91.379 87.085,91.363 87.065,91.382 82.296,91.382

## Silkscreen, mask and mechanical layers (free items; w line width, h text height)
Bottom Solder Mask Layer:
  region: 92.075,102.616 99.695,102.616 99.695,95.377 92.075,95.377
Mechanical Layer:
  the board outline again, w0.254